# Altium PCB ZZ_KOM_ACB23_4009.PcbDoc (part 1 of 3)
Units mil, origin at the board's own origin, x right, y up, seen from the top; angles counter-clockwise.
Board outline 3937.01 x 2755.91 mil, 4 copper layers (Top Layer, Signal Layer 1, Signal Layer 2, Bottom Layer), stack 63.662 mil thick; 118 components, 212 nets, 909 pads, 347 vias.
Unrouted connection lines stored in the file: 40.
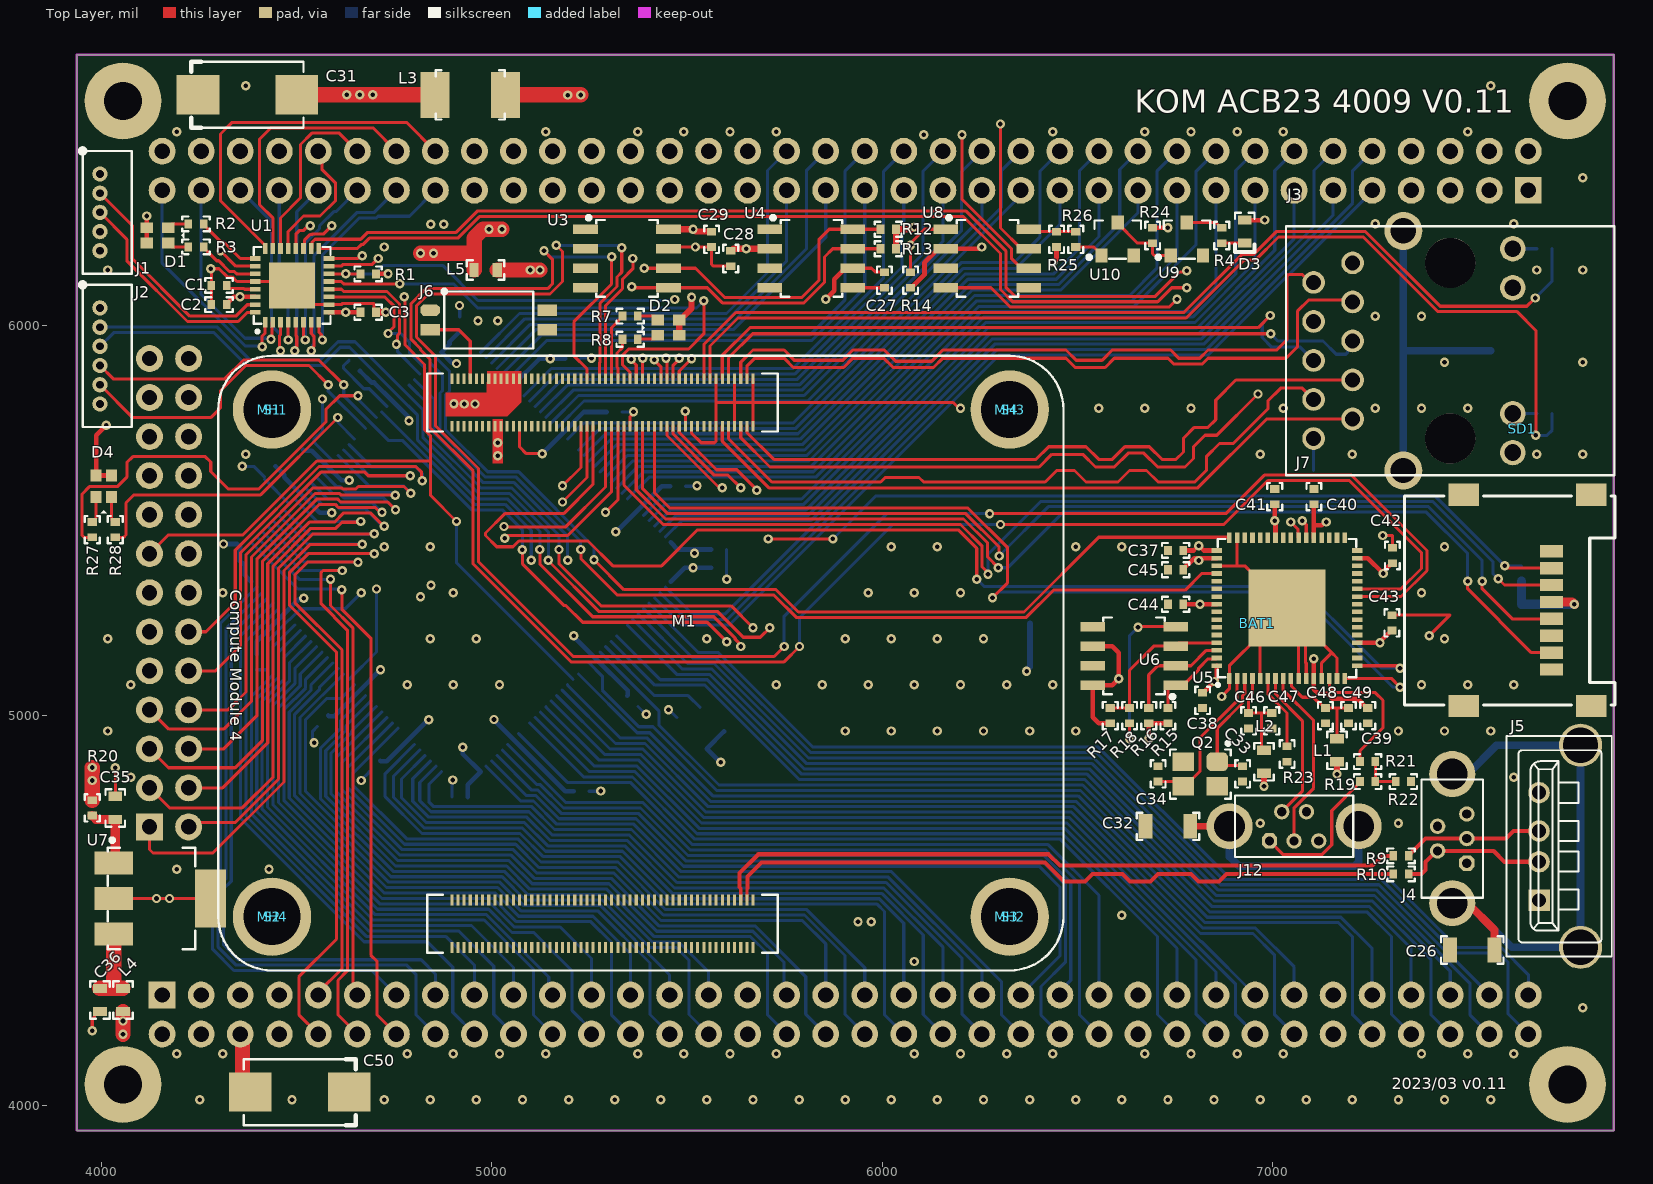
[diagram p0: Top Layer view]
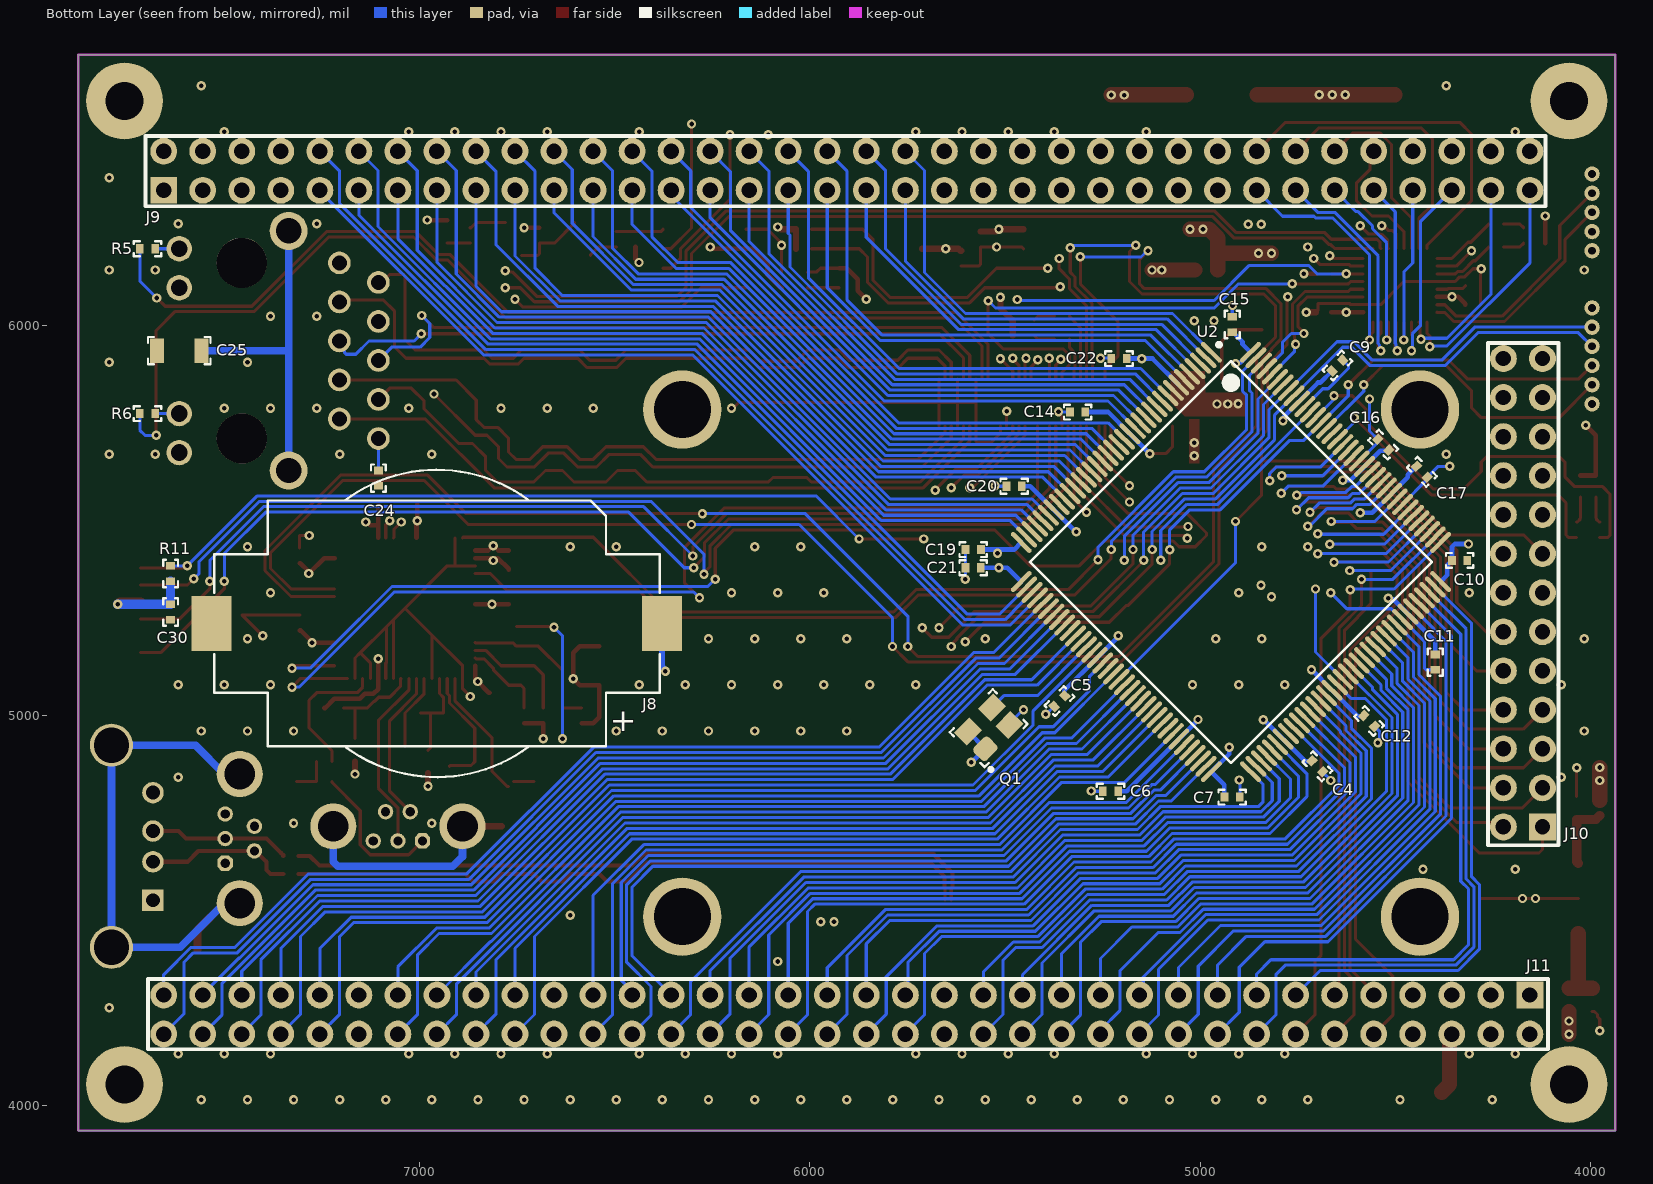
[diagram p1: Bottom Layer view, seen from below]
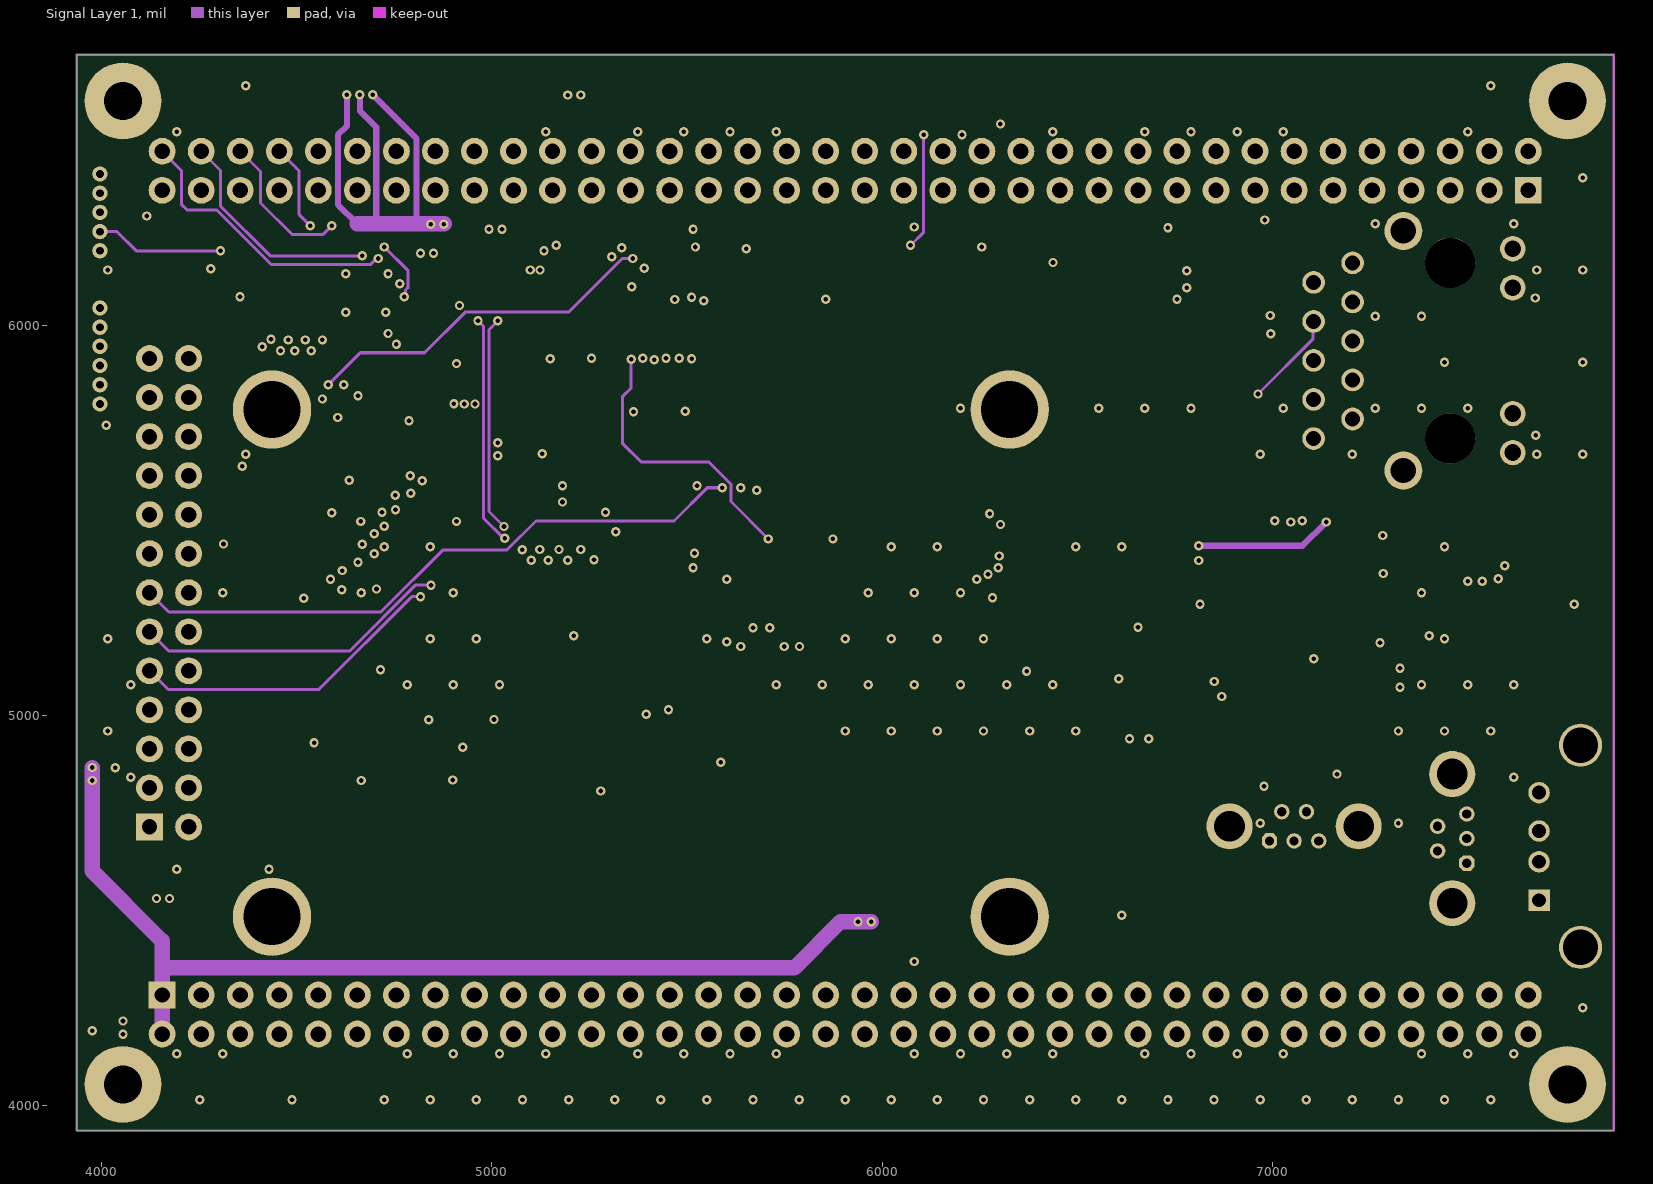
[diagram p2: Signal Layer 1]
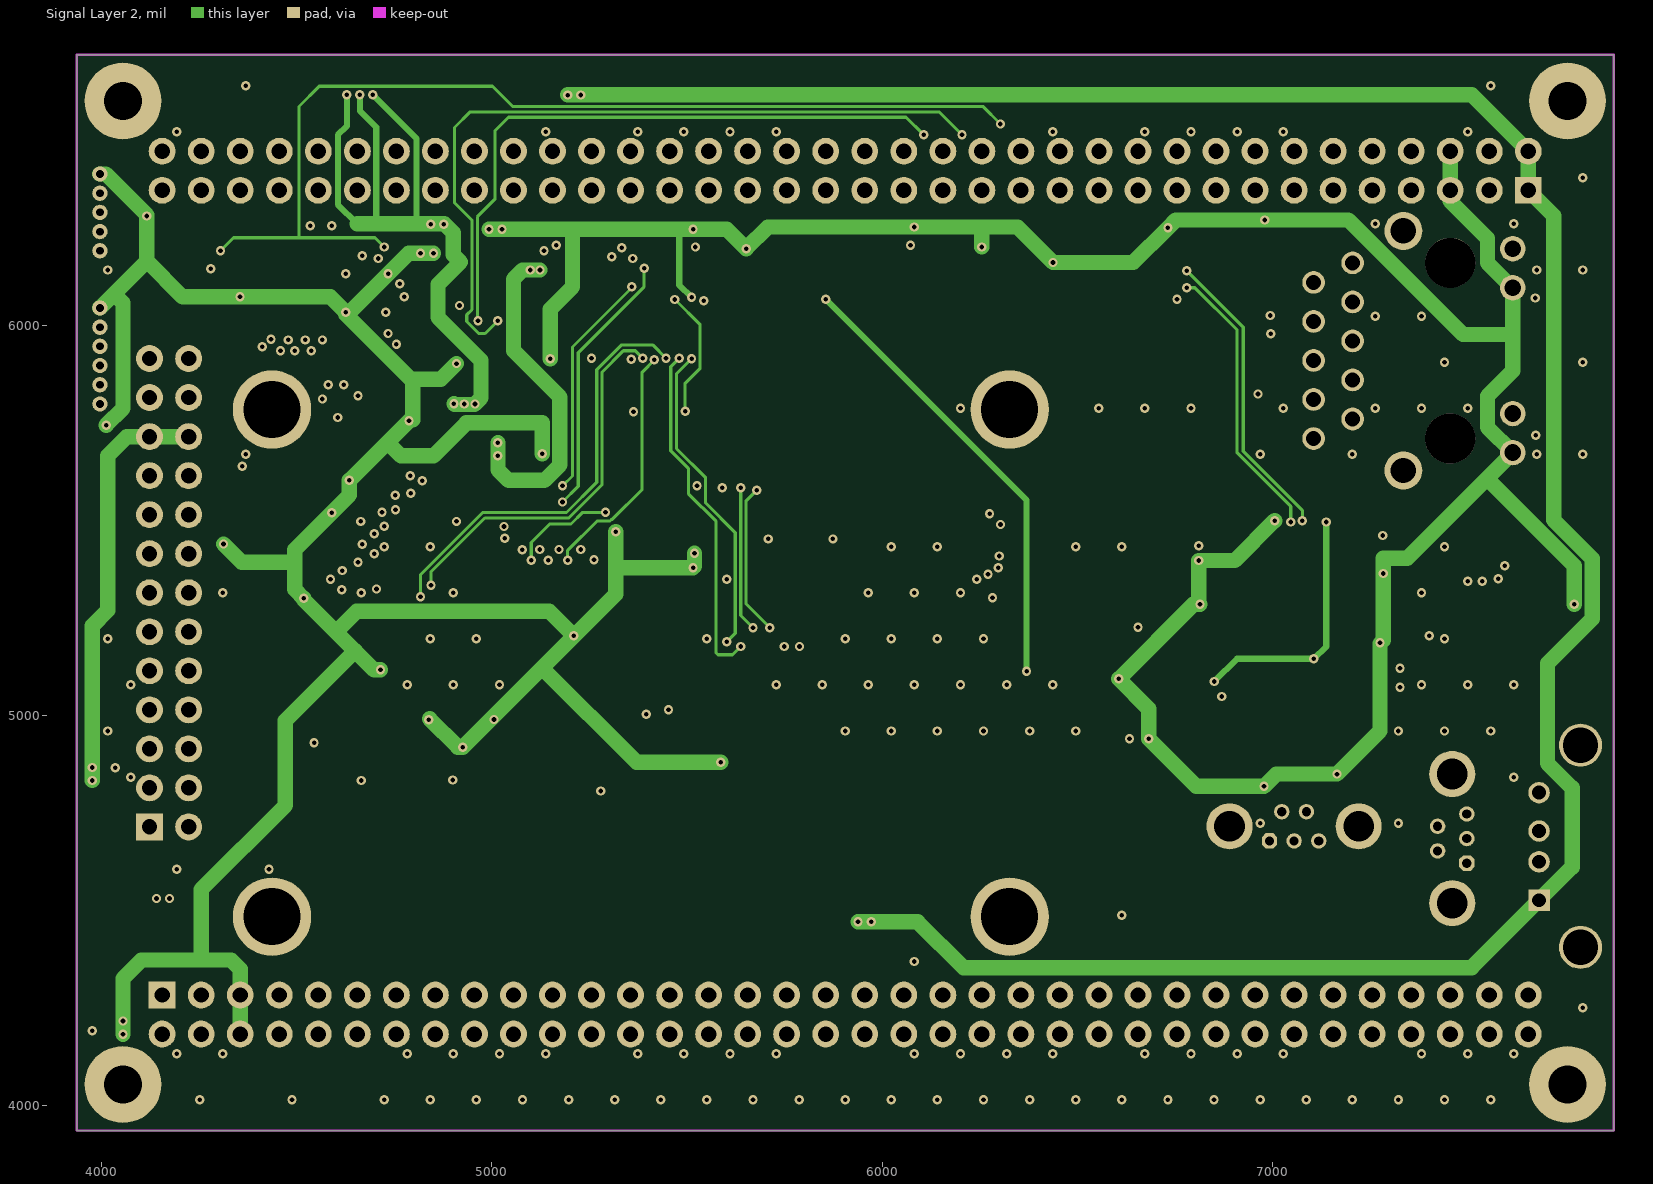
[diagram p3: Signal Layer 2]
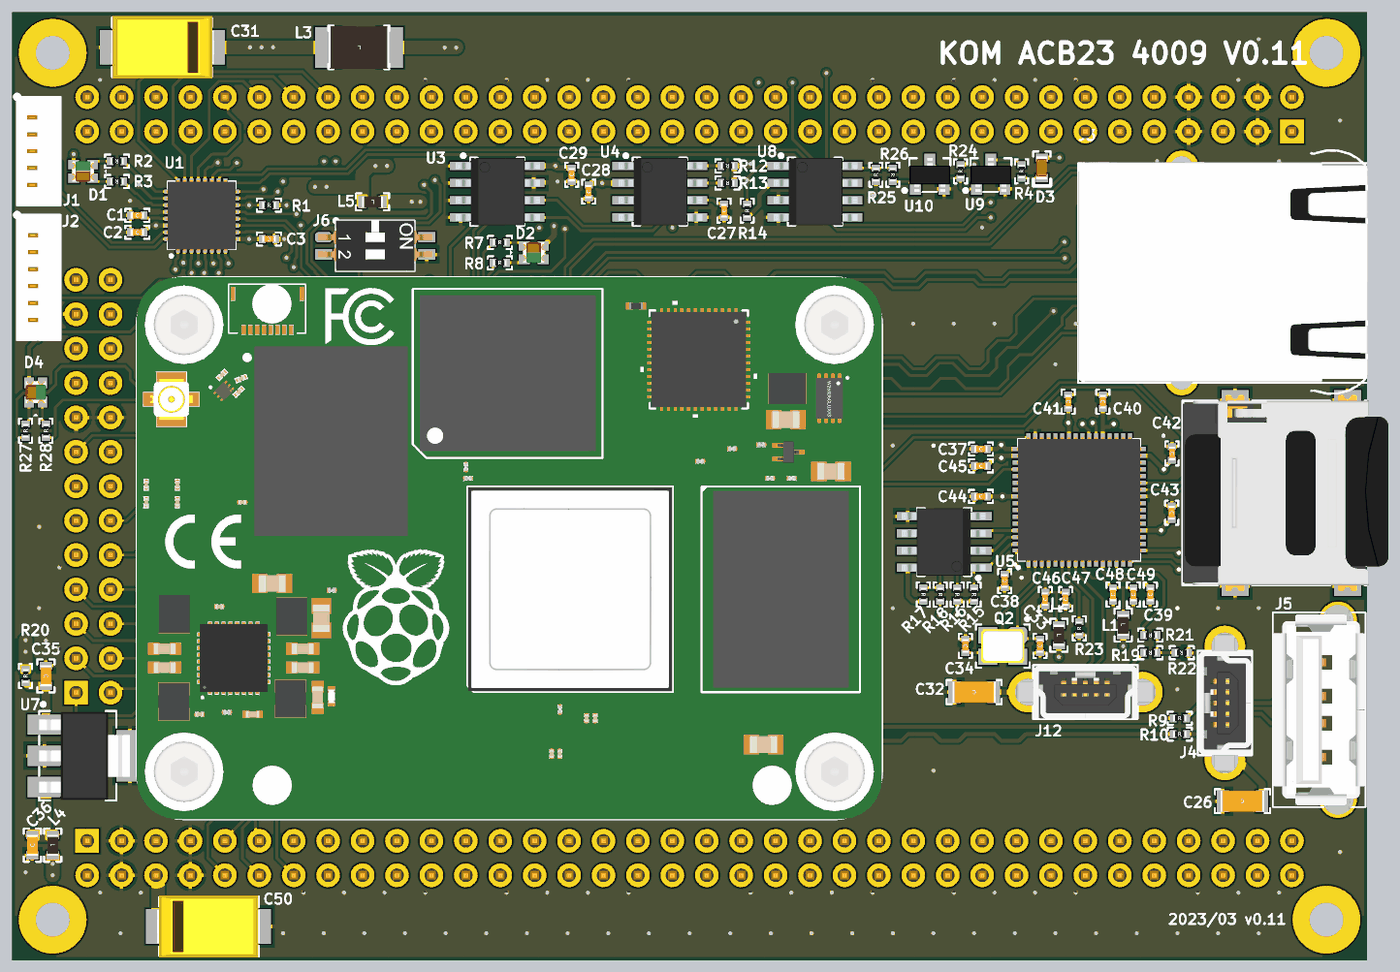
[diagram p6: 3D render of the assembled board from above, using the file's embedded part models]
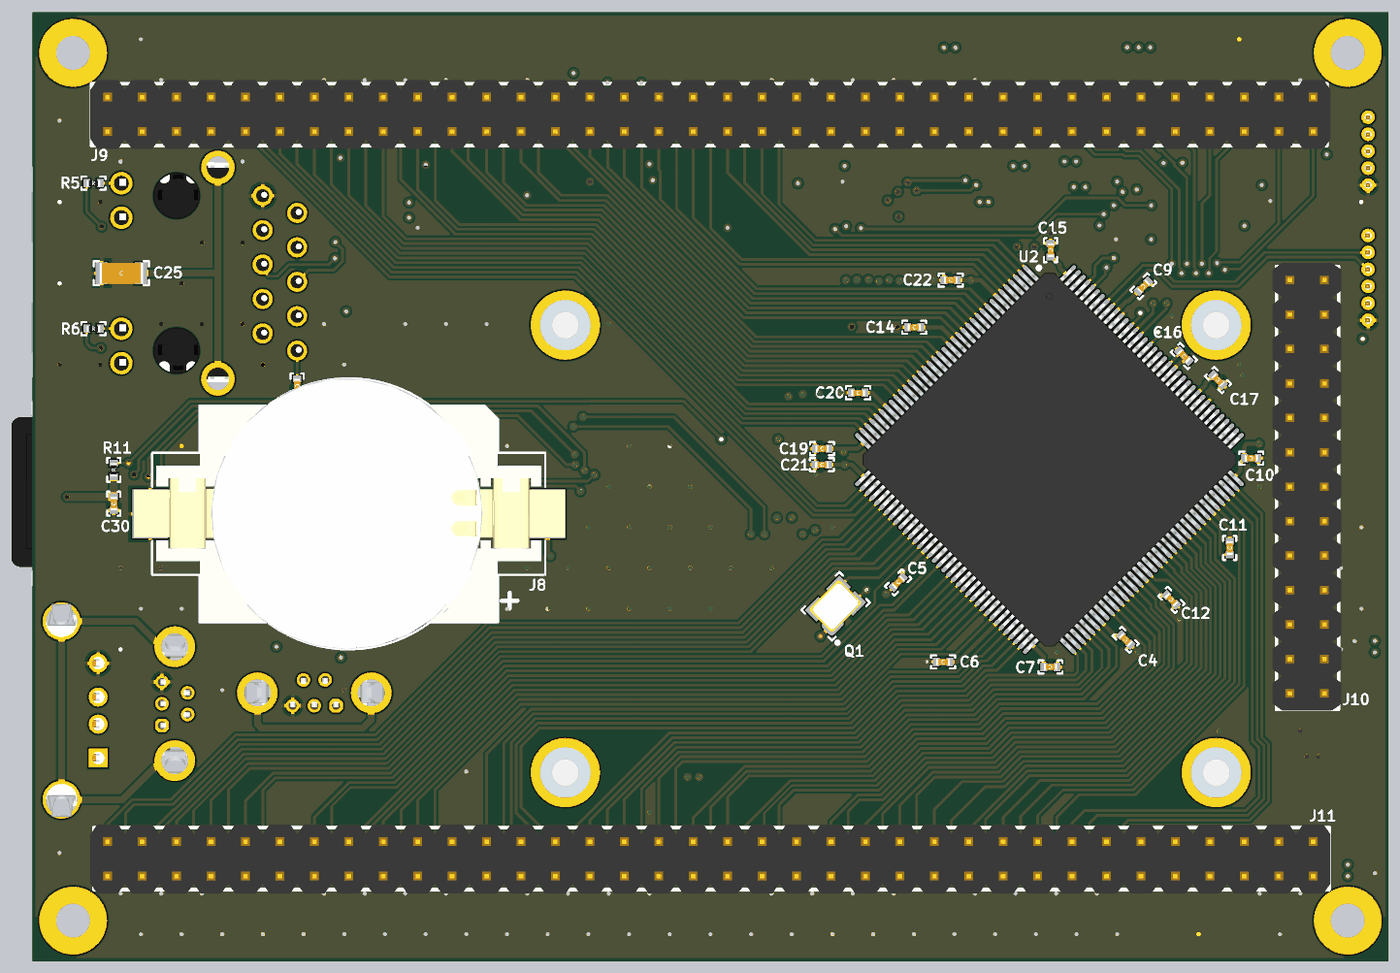
[diagram p7: 3D render of the assembled board from below, using the file's embedded part models]

## Layer stack, top to bottom
Top Solder: solder mask 0.6693, Solder Resist, Dk 3.5
Top Layer: signal copper 0.689
Dielectric 1: prepreg 6.1417, FR-4, Dk 3.9
Signal Layer 1: signal copper 1.378
Dielectric 2: core 47.2441, FR-4, Dk 4.4
Signal Layer 2: signal copper 1.378
Dielectric 3: prepreg 6.1417, FR-4, Dk 3.9
Bottom Layer: signal copper 0.689
Bottom Solder: solder mask 0.6693, Solder Resist, Dk 3.5

## Board outline
3937.01,3937.01 7874.02,3937.01 7874.02,6692.91 3937.01,6692.91

## Design rules (kind name [scope] priority, off if disabled: settings)
AcuteAngle [All] p1: minimum=5.00000000000000E+0001 checktracksonly=FALSE
Clearance PolygonClearance [InPolygon] p1: gap=6 ignorepadtopadclearanceinfootprint=FALSE except(0: Arc-Hole Track-Hole SMDPad-Hole THPad-Hole Via-Hole Fill-Hole Poly-Hole Region-Hole Text-Hole)
Clearance TopKeepoutClearance [OnLayer('Top Layer') vs OnLayer('Keep-Out Layer')] p2: gap=0 ignorepadtopadclearanceinfootprint=FALSE
Clearance BotKeepoutClearance [OnLayer('Bottom Layer') vs OnLayer('Keep-Out Layer')] p3: gap=0 ignorepadtopadclearanceinfootprint=FALSE
Clearance StdClearance [All] p4: gap=6 ignorepadtopadclearanceinfootprint=FALSE except(0: Arc-Hole Track-Hole SMDPad-Hole THPad-Hole Via-Hole Fill-Hole Poly-Hole Region-Hole Text-Hole)
ComponentClearance [All] p1 off: gap=10 collisioncheckmode=3 verticalgap=10 showdistances=FALSE
DiffPairsRouting Diff_Ethernet [InDifferentialPairClass('Ethernet')] p1: maxlimit=39.37 minlimit=5.91 mostfreqgap=23.62 toplayer_minwidth=7.87 toplayer_maxwidth=10.63 toplayer_prefwidth=10.63 midlayer1_minwidth=7.87 midlayer1_maxwidth=10.63 midlayer1_prefwidth=10.63 midlayer2_minwidth=7.87 midlayer2_maxwidth=10.63 midlayer2_prefwidth=10.63 bottomlayer_minwidth=7.87 bottomlayer_maxwidth=10.63 bottomlayer_prefwidth=10.63 maxuncoupledlength=500
DiffPairsRouting Diff_USB [InDifferentialPair('USB')] p2: maxlimit=5 minlimit=5 mostfreqgap=5 toplayer_minwidth=7.24 toplayer_maxwidth=7.24 toplayer_prefwidth=7.24 midlayer1_minwidth=2.93 midlayer1_maxwidth=2.93 midlayer1_prefwidth=2.93 midlayer2_minwidth=2.93 midlayer2_maxwidth=2.93 midlayer2_prefwidth=2.93 bottomlayer_minwidth=7.24 bottomlayer_maxwidth=7.24 bottomlayer_prefwidth=7.24 maxuncoupledlength=500
Height [All] p1: minheight=0 maxheight=2000 prefheight=500
HoleSize [All] p1: absolutevalues=TRUE maxlimit=196.85 minlimit=7.87 maxpercent=80.000 minpercent=20.000
MinimumAnnularRing [All] p1: minimumring=3.94
MinimumSolderMaskSliver [All] p1: minsoldermaskwidth=1
MinimumSolderMaskSliver SilkscreenOverComponentPads [All] p2 off: minsoldermaskwidth=10
PlaneConnect [All] p1: planeconnectstyle=Relief reliefexpansion=20 reliefentries=4 reliefconductorwidth=10 reliefairgap=20
PolygonConnect PolygonConnect_else [All vs IsPad] p1: connectstyle=Relief reliefconductorwidth=10 reliefentries=4 polygonreliefangle="90 Angle" airgapwidth=12
PolygonConnect PolygonConnect_direkt [All] p2: connectstyle=Direct reliefconductorwidth=10 reliefentries=4 polygonreliefangle="90 Angle" airgapwidth=10
RoutingVias [All] p1: holewidth=11.81 width=23.62 viastyle="Through Hole" minholewidth=11.81 minwidth=23.62 maxholewidth=118.11 maxwidth=157.48
SilkToBoardRegionClearance SilkToBoardRegionClearance_1 [All] p2:
SilkToSilkClearance [All] p1 off: silktosilkclearance=10
SilkToSolderMaskClearance [IsPad] p1: minsilkscreentomaskgap=0 clearancetoexposedcopper=TRUE
SolderMaskExpansion SolderMaskExpansion_1 [All] p1: expansion=4 istentingtop=FALSE
Width [All] p1: maxlimit=100 minlimit=4.92 preferedwidth=16 checkconnectedcopper=TRUE
22 further rules are at their usual default settings.

## Classes and differential pairs
component class 04_KOM_ACB23_4009_AdditionalComponents: BAT1 MH1 MH2 MH3 MH4 S1 S2 S3 S4 SD1
component class 09_KOM_ACB23_4009_Periphery: C31 C32 C33 C34 C35 C36 C37 C38 C39 C40 C41 C42 C43 C44 C45 C46 C47 C48 C49 C50 D3 J12 L1 L2 L3 L4 L5 Q2 R4 R15 R16 R17 R18 R19 R20 R21 R22 R23 R24 R25 R26 U5 U6 U7 U8 U9 U10
component class 08_KOM_ACB23_4009_Connectors: J9 J10 J11
component class 07_KOM_ACB23_4009_ComputeModule: C24 C25 C26 C27 C28 C29 C30 D2 J3 J4 J5 J6 J7 J8 M1 R5 R6 R7 R8 R9 R10 R11 R12 R13 R14 U3 U4
component class 06_KOM_ACB23_4009_FPGA: C4 C5 C6 C7 C9 C10 C11 C12 C14 C15 C16 C17 C19 C20 C21 C22 D4 J2 Q1 R27 R28 U2
component class 05_KOM_ACB23_4009_MicroController: C1 C2 C3 D1 J1 R1 R2 R3 U1
differential pair PAIR0: +PAIR0_P -PAIR0_N
differential pair PAIR1: +PAIR1_P -PAIR1_N
differential pair PAIR2: +PAIR2_P -PAIR2_N
differential pair PAIR3: +PAIR3_P -PAIR3_N
differential pair USB: +USB_P -USB_N

## Components (designator, comment, footprint, x,y, rotation, side; value= is the part's Value field where it differs from the comment)
BAT1 "CR2032" CR2032 6960.84,5236.22 r0 top
C1 "C0402C104K3RACTU" C0402 4301.18,6102.36 r0 top value=100nF
C2 "C0402C104K3RACTU" C0402 4301.18,6053.15 r0 top value=100nF
C3 "C0402C104K3RACTU" C0402 4683.46,6033.46 r180 top value=100nF
C4 "C0402C104K3RACTU" C0402 4699.89,4870.33 r45 bottom value=100nF
C5 "C0402C104K3RACTU" C0402 5360.5,5037.36 r135 bottom value=100nF
C6 "C0402C104K3RACTU" C0402 5229.98,4806.25 r180 bottom value=100nF
C7 "C0402C104K3RACTU" C0402 4918.25,4791.59 r0 bottom value=100nF
C9 "C0402C104K3RACTU" C0402 4648.44,5896.97 r315 bottom value=100nF
C10 "C0402C104K3RACTU" C0402 4335.15,5397.72 r0 bottom value=100nF
C11 "C0402C104K3RACTU" C0402 4397.89,5137.23 r90 bottom value=100nF
C12 "C0402C104K3RACTU" C0402 4567.23,4986.46 r45 bottom value=100nF
C14 "C0402C104K3RACTU" C0402 5313.99,5777.88 r180 bottom value=100nF
C15 "C0402C104K3RACTU" C0402 4918,6002 r270 bottom value=100nF
C16 "C0402C104K3RACTU" C0402 4531.08,5694.41 r225 bottom value=100nF
C17 "C0402C104K3RACTU" C0402 4432.05,5624.85 r45 bottom value=100nF
C19 "C0402C104K3RACTU" C0402 5581.51,5425.57 r180 bottom value=100nF
C20 "C0402C104K3RACTU" C0402 5476.79,5587.78 r180 bottom value=100nF
C21 "C0402C104K3RACTU" C0402 5581.82,5378.99 r180 bottom value=100nF
C22 "C0402C104K3RACTU" C0402 5207.91,5914.96 r180 bottom value=100nF
C24 "C0402C104K3RACTU" C0402 7105.51,5608.46 r270 bottom value=100nF
C25 "CC1206KKX7RSBB102" C1206 7615.75,5935.04 r180 bottom value=1.0nF
C26 "CC1206KKX7RSBB102" C1206 7511.81,4399.61 r180 top value=1.0nF
C27 "C0402C104K3RACTU" C0402 6005.91,6115.94 r90 top value=100nF
C28 "C0402C104K3RACTU" C0402 5612.2,6171.26 r90 top value=100nF
C29 "C0402C104K3RACTU" C0402 5562.99,6220.47 r90 top value=100nF
C30 "C0402C104K3RACTU" C0402 7637.8,5265.75 r90 bottom value=100nF
C31 "T491D227K010AT" TANTAL_7343 4374.02,6590.55 r180 top value=220uF
C32 "CC1206KKX7RSBB102" C1206 6732.28,4716.54 r180 top value=1.0nF
C33 "C0402C220J4GACAUTO" C0402 6923.62,4850.79 r90 top value=22pF
C34 "C0402C220J4GACAUTO" C0402 6707.09,4850.79 r270 top value=22pF
C35 "JMK107BJ106MA-T" C0603 4035.43,4763.78 r270 top value=10uF
C36 "JMK107BJ106MA-T" C0603 3996.06,4271.65 r90 top value=10uF
C37 "GRM153R60J475ME15D" C0402 6751.97,5423.23 r0 top value=4.7uF
C38 "C0402C104K3RACTU" C0402 6820.87,5039.37 r90 top value=100nF
C39 "C0402C104K3RACTU" C0402 7244.09,5000 r90 top value=100nF
C40 "C0402C104K3RACTU" C0402 7106.3,5561.02 r270 top value=100nF
C41 "C0402C104K3RACTU" C0402 7005.91,5561.02 r270 top value=100nF
C42 "C0402C104K3RACTU" C0402 7307.27,5410.46 r270 top value=100nF
C43 "C0402C104K3RACTU" C0402 7306.29,5237.9 r270 top value=100nF
C44 "C0402C104K3RACTU" C0402 6751.97,5285.43 r0 top value=100nF
C45 "C0402C104K3RACTU" C0402 6751.97,5374.02 r0 top value=100nF
C46 "GRM153R60J475ME15D" C0402 6938.98,4986.93 r90 top value=4.7uF
C47 "C0402C104K3RACTU" C0402 6998.03,4986.93 r90 top value=100nF
C48 "GRM153R60J475ME15D" C0402 7135.83,5000 r90 top value=4.7uF
C49 "C0402C104K3RACTU" C0402 7194.88,5000 r90 top value=100nF
C50 "T491D227K010AT" TANTAL_7343 4507.87,4035.43 r0 top value=220uF
D1 "LTST-C195KGJRKT" "SMD LED 0606 DUAL GREEN RED" 4143.7,6230.31 r180 top
D2 "LTST-C195KGJRKT" "SMD LED 0606 DUAL GREEN RED" 5452.76,5994.09 r0 top
D3 "APT1608EC" "LED 0603 RED" 6929.13,6240.16 r270 top
D4 "LTST-C195KGJRKT" "SMD LED 0606 DUAL GREEN RED" 4005.91,5587.78 r90 top
J1 "53047-0510" "PicoBlade 01x05 THT Male" 3996.06,6289.37 r90 top
J2 "53047-0610" "PicoBlade 01x06 THT Male" 3996.06,5921.58 r90 top
J3 "93626-3006" 93626-3508 7455.51,5935.04 r90 top
J4 "651005136421" "USB MiniUSB B Vertical THT" 7460.63,4685.04 r90 top
J5 "614004135023" 614004135023 7736.22,4665.35 r90 top
J6 "416131160802" 416131160802 4992.13,6013.78 r0 top
J7 "693072010801" 693072010801 7608.27,5295.28 r90 top
J8 "1060TR" 1060TR 6955.51,5236.22 r180 bottom
J9 "77313-424-72LF" "Pinheader 02x36" 7655.51,6346.06 r180 bottom locked
J10 "75844-127-26LF" "Pinheader 02x13" 4123.22,4714.96 r90 bottom locked
J11 "77313-424-72LF" "Pinheader 02x36" 4155.51,4284.25 r0 bottom locked
J12 "651005136421" "USB MiniUSB B Vertical THT" 7055.51,4716.54 r0 top
L1 "742792651" L0603 7165.35,4911.42 r270 top
L2 "742792651" L0603 6978.35,4881.89 r270 top
L3 "742792514" L1812 4944.88,6590.55 r180 top
L4 "742792651" L0603 4055.12,4271.65 r270 top
L5 "742792651" L0603 4984.25,6141.73 r180 top
M1 "RaspberryPi Compute Module 4" RASPBERRYCOMPUTEMODULE4 5381.89,5134.65 r270 top locked
MH1 "9774015151R" 9774015151R 4437.01,5784.25 r0 top
MH2 "9774015151R" 9774015151R 6326.77,4485.04 r0 top
MH3 "9774015151R" 9774015151R 6326.77,5784.25 r0 top
MH4 "9774015151R" 9774015151R 4437.01,4485.04 r0 top
Q1 "ECS-3225MV-480-CN-TR" Crystal_3.2x2.5 5542,4967.9 r135 bottom value="48.0 Mhz"
Q2 "ABM8W-12.0000MHZ-7-D1X-T3" Crystal_3.2x2.5 6815.35,4850.39 r180 top value="12.0 Mhz"
R1 "RC0402FR-0710KL" R0402 4683.46,6131.89 r0 top value=10.0k
R2 "RC0402FR-07220RL" R0402 4242.13,6259.84 r180 top value=220R
R3 "RC0402FR-07220RL" R0402 4242.13,6200.79 r180 top value=220R
R4 "RC0402FR-07220RL" R0402 6870.08,6230.31 r90 top value=220R
R5 "RC0402FR-07430RL" R0402 7696.85,6196.26 r180 bottom value=430R
R6 "RC0402FR-07430RL" R0402 7696.85,5773.82 r180 bottom value=430R
R7 "RC0402FR-07220RL" R0402 5354.33,6023.62 r0 top value=220R
R8 "RC0402FR-07220RL" R0402 5354.33,5964.57 r0 top value=220R
R9 "RC0402FR-0722RL" R0402 7329.53,4640.84 r0 top value=22.0R
R10 "RC0402FR-0722RL" R0402 7329.53,4594.49 r0 top value=22.0R
R11 "RC0402FR-0710KL" R0402 7637.8,5364.17 r90 bottom value=10.0k
R12 "RC0402FR-0710KL" R0402 6015.75,6246.26 r180 top value=10.0k
R13 "RC0402FR-0710KL" R0402 6015.75,6196.26 r180 top value=10.0k
R14 "RC0402FR-0710KL" R0402 6072.83,6115.94 r90 top value=10.0k
R15 "RC0402FR-0710KL" R0402 6732.28,5000 r270 top value=10.0k
R16 "RC0402FR-0710KL" R0402 6683.07,5000 r270 top value=10.0k
R17 "RC0402FR-0710KL" R0402 6584.65,5000 r270 top value=10.0k
R18 "RC0402FR-072K2L" R0402 6633.86,5000 r270 top value=2.2k
R19 "RC0402FR-074K7L" R0402 7244.09,4831.1 r180 top value=4.7k
R20 "RC0402FR-070RL" R0402 3976.38,4763.78 r90 top value=0R
R21 "RC0402FR-071KL" R0402 7244.09,4882.28 r180 top value=1.0k
R22 "RC0402FR-0710KL" R0402 7335.43,4831.1 r180 top value=10.0k
R23 "RC0402FR-0712KL" R0402 7037.4,4901.97 r90 top value=12.0k
R24 "RC0402FR-072K2L" R0402 6692.91,6230.31 r90 top value=2.2k
R25 "RC0402FR-0710KL" R0402 6446.85,6220.47 r90 top value=10.0k
R26 "RC0402FR-0710KL" R0402 6496.06,6220.47 r270 top value=10.0k
R27 "RC0402FR-07220RL" R0402 3976.38,5476.43 r90 top value=220R
R28 "RC0402FR-07220RL" R0402 4035.43,5476.43 r90 top value=220R
S1 "DIN912 M2.5x4" "DIN912 M2.5x4" 4437.01,5784.25 r0 top
S2 "DIN912 M2.5x4" "DIN912 M2.5x4" 4437.01,4485.04 r0 top
S3 "DIN912 M2.5x4" "DIN912 M2.5x4" 6326.77,4485.04 r0 top
S4 "DIN912 M2.5x4" "DIN912 M2.5x4" 6326.77,5784.25 r0 top
SD1 "MicroSD Card" MICROSDCARD 7640.32,5734.57 r90 top
U1 "ATSAMC21E17A-MUT" QFN32_5x5_0.50 4488.19,6102.36 r90 top
U2 "LCMXO2-7000HC-4TG144C" TQFP-144_20x20_P0.5 4921.26,5393.7 r225 bottom locked
U3 "24LC512-I/SN" soic-8 5346.46,6171.26 r270 top
U4 "DS3231MZ+" SOIC-8 5818.9,6171.26 r270 top
U5 "FT4232HQ" QFN64_9x9_0.50 7037.4,5275.59 r90 top
U6 "93LC46B-I/SN" SOIC-8 6645.67,5152.95 r90 top
U7 "LT1963EST-3.3#PBF" SOT-223-2 4031.5,4622.05 r0 top
U8 "MAX706TESA+T" SOIC-8 6269.69,6171.26 r270 top
U9 "BC847C,235" SOT-23-3 6781.5,6220.47 r90 top
U10 "BC847C,235" SOT-23-3 6604.33,6220.47 r90 top

## Footprints (in the part's own frame and the unit in brackets; to place one, negate y for a bottom-side part, rotate by r counter-clockwise, add the part's x,y. Pads: shape width x height; smd on the part's side, far side on the other; paste and mask are expansions set on the pad)
1060TR [mm] "Batteriehalter CR2032"
  rect 2.6x3.6 smd: +(14.655,0) -(-14.655,0)
  silkscreen extent -14.5,-10 14.5,10, body extent -15.86,-7.96 15.97,8.04, height 5.69
93626-3508 [mm] "Molex MagJack 1Gbit without POE"
  round 1.478 hole 0.97: 1(-5.715,8.89) 2(-4.445,6.35) 3(-3.175,8.89) 4(-1.905,6.35) 5(-0.635,8.89) 6(0.635,6.35) 7(1.905,8.89) 8(3.175,6.35) 9(4.445,8.89) 10(5.715,6.35)
  round 1.65 hole 1.1: 11(-6.635,-4.07) 12(-4.095,-4.07) 13(4.095,-4.07) 14(6.635,-4.07)
  round 2.475 hole 1.65: S(-7.795,3.05) S(7.795,3.05)
  round 3.26 hole 3.26 unplated: ""(-5.715,0) ""(5.715,0)
  silkscreen extent -8.1,-10.69 8.1,10.69, body extent -9.01,-10.69 9.14,10.69, height 15.2
9774015151R [mm] "WA-SMSE SMD Steel M2.5 Internal L2.9mm (1.5mm)"
  round 5.1 hole 3.7: 2775(0,0)
  body extent -2.55,-2.55 2.55,2.55, height 1.5
416131160802 [mm]
  oct 1.27x0.76 smd: L1(-3.81,0.635)
  rect 1.27x0.76 smd: L2(-3.81,-0.635) R1(3.81,0.635) R2(3.81,-0.635)
  silkscreen extent -3.03,-1.86 2.9,1.98, body extent -4.22,-1.86 4.22,1.86, height 2.6
614004135023 [mm] "4 pins"
  rect 1.4x1.4 hole 0.9: 1(-3.51,1.35)
  round 1.4 hole 0.9: 2(-1.01,1.35) 3(0.99,1.35) 4(3.49,1.35)
  round 2.8 hole 2.3: S(-6.58,-1.35) S(6.58,-1.35)
  silkscreen extent -7.18,-3.38 7.17,3.46, body extent -7.85,-3.38 7.85,3.46, height 3.47
693072010801 [mm] "Micro SD Card Connector Hinge - 8 Pins"
  rect 0.8x1.5 smd: 1(3.2,-2.7) 2(2.1,-2.7) 3(1,-2.7) 4(-0.1,-2.7) 5(-1.2,-2.7) 6(-2.3,-2.7) 7(-3.4,-2.7) 8(-4.5,-2.7)
  rect 1.45x2 smd: Shield(-6.875,-5.3) Shield(-6.875,3) Shield(6.875,-5.3) Shield(6.875,3)
  silkscreen extent -6.8,-6.85 6.8,6.85, body extent -7.25,-6.85 7.25,6.85, height 1.79
C0402 [mm]
  rect 0.5x0.6 smd: 1(-0.5,0) 2(0.5,0)
  silkscreen extent -0.89,-0.48 0.89,0.48, body extent -0.5,-0.25 0.5,0.25, height 0.35
C0603 [mm]
  rect 0.6x0.9 smd: 1(-0.75,0) 2(0.75,0)
  silkscreen extent -1.22,-0.64 1.22,0.64, body extent -0.77,-0.42 0.78,0.43, height 0.35
C1206 [mm]
  rect 0.9x1.6 smd: 1(-1.45,0) 2(1.45,0)
  silkscreen extent -2.03,-0.89 2.03,0.89, body extent -1.6,-0.8 1.6,0.8, height 0.55
CR2032 [mil]
  body extent -394,-394 394,394
Crystal_3.2x2.5 [mm]
  rrect50% 1.4x1.2 smd: 1(-1.1,-0.8)
  rect 1.4x1.2 smd: 2(1.1,-0.8) 3(1.1,0.8) 4(-1.1,0.8)
  silkscreen extent -1.98,-2.1 1.98,1.6, body extent -1.6,-1.25 1.6,1.25, height 0.7
"DIN912 M2.5x4" [mil]
  body extent -89,-89 89,88, height 201
L0603 [mm]
  rect 0.6x0.9 smd: 1(-0.75,0) 2(0.75,0)
  silkscreen extent -1.22,-0.64 1.22,0.64, body extent -0.77,-0.42 0.78,0.43, height 0.35
L1812 [mm]
  rect 1.9x3 smd: 1(-2.3,0) 2(2.3,0)
  silkscreen extent -2.25,-1.6 2.25,1.6, body extent -2.25,-1.6 2.25,1.6, height 1.5
"LED 0603 RED" [mm]
  rect 0.6x0.9 smd: 1(-0.75,0) 2(0.75,0)
  silkscreen extent -1.22,-0.64 1.32,0.64, body extent -0.85,-0.4 0.85,0.4, height 0.65
MICROSDCARD [mil]
  body extent -653,-296 -217,296, height 63
"PicoBlade 01x05 THT Male" [mm]
  round 1 hole 0.5: 1(2.5,0) 2(1.25,0) 3(0,0) 4(-1.25,0) 5(-2.5,0)
  silkscreen extent -4,-2.07 4.18,1.3, body extent -4.01,-2.06 3.99,1.14, height 4.24
"PicoBlade 01x06 THT Male" [mm]
  round 1 hole 0.5: 1(3.125,0) 2(1.875,0) 3(0.625,0) 4(-0.625,0) 5(-1.875,0) 6(-3.125,0)
  silkscreen extent -4.62,-2.07 4.8,1.3, body extent -4.62,-2.1 4.63,1.1, height 4.23
"Pinheader 02x13" [mm]
  rect 1.75x1.75 hole 1: 1(0,0)
  round 1.75 hole 1: 2(0,2.54) 3(2.54,0) 4(2.54,2.54) 5(5.08,0) 6(5.08,2.54) 7(7.62,0) 8(7.62,2.54) 9(10.16,0) 10(10.16,2.54) 11(12.7,0) 12(12.7,2.54) 13(15.24,0) 14(15.24,2.54) 15(17.78,0) 16(17.78,2.54) 17(20.32,0) 18(20.32,2.54) 19(22.86,0) 20(22.86,2.54) 21(25.4,0) 22(25.4,2.54) 23(27.94,0) 24(27.94,2.54) 25(30.48,0) 26(30.48,2.54)
  silkscreen extent -1.19,-1.04 31.5,3.53, body extent -1.27,-1.27 31.75,3.81, height 10.1
"Pinheader 02x36" [mm]
  rect 1.75x1.75 hole 1: 1(0,0)
  round 1.75 hole 1: 2(0,2.54) 3(2.54,0) 4(2.54,2.54) 5(5.08,0) 6(5.08,2.54) 7(7.62,0) 8(7.62,2.54) 9(10.16,0) 10(10.16,2.54) 11(12.7,0) 12(12.7,2.54) 13(15.24,0) 14(15.24,2.54) 15(17.78,0) 16(17.78,2.54) 17(20.32,0) 18(20.32,2.54) 19(22.86,0) 20(22.86,2.54) 21(25.4,0) 22(25.4,2.54) 23(27.94,0) 24(27.94,2.54) 25(30.48,0) 26(30.48,2.54) 27(33.02,0) 28(33.02,2.54) 29(35.56,0) 30(35.56,2.54) 31(38.1,0) 32(38.1,2.54) 33(40.64,0) 34(40.64,2.54) 35(43.18,0) 36(43.18,2.54) 37(45.72,0) 38(45.72,2.54) 39(48.26,0) 40(48.26,2.54) 41(50.8,0) 42(50.8,2.54) 43(53.34,0) 44(53.34,2.54) 45(55.88,0) 46(55.88,2.54) 47(58.42,0) 48(58.42,2.54) 49(60.96,0) 50(60.96,2.54) 51(63.5,0) 52(63.5,2.54) 53(66.04,0) 54(66.04,2.54) 55(68.58,0) 56(68.58,2.54) 57(71.12,0) 58(71.12,2.54) 59(73.66,0) 60(73.66,2.54) 61(76.2,0) 62(76.2,2.54) 63(78.74,0) 64(78.74,2.54) 65(81.28,0) 66(81.28,2.54) 67(83.82,0) 68(83.82,2.54) 69(86.36,0) 70(86.36,2.54) 71(88.9,0) 72(88.9,2.54)
  silkscreen extent -1.19,-1.04 89.92,3.53, body extent -1.27,-1.27 90.17,3.81, height 10.1
QFN32_5x5_0.50 [mm]
  rect 0.7x0.3 smd: 1(-2.4,1.75) 2(-2.4,1.25) 3(-2.4,0.75) 4(-2.4,0.25) 5(-2.4,-0.25) 6(-2.4,-0.75) 7(-2.4,-1.25) 8(-2.4,-1.75) 17(2.4,-1.75) 18(2.4,-1.25) 19(2.4,-0.75) 20(2.4,-0.25) 21(2.4,0.25) 22(2.4,0.75) 23(2.4,1.25) 24(2.4,1.75)
  rect 0.3x0.7 smd: 9(-1.75,-2.4) 10(-1.25,-2.4) 11(-0.75,-2.4) 12(-0.25,-2.4) 13(0.25,-2.4) 14(0.75,-2.4) 15(1.25,-2.4) 16(1.75,-2.4) 25(1.75,2.4) 26(1.25,2.4) 27(0.75,2.4) 28(0.25,2.4) 29(-0.25,2.4) 30(-0.75,2.4) 31(-1.25,2.4) 32(-1.75,2.4)
  rect 3x3 smd: EP(0,0)
  silkscreen extent -3.08,-2.5 2.5,2.5, body extent -2.61,-2.59 2.59,2.61, height 0.76
QFN64_9x9_0.50 [mm]
  rect 0.7x0.3 smd: 1(-4.575,3.75) 2(-4.575,3.25) 3(-4.575,2.75) 4(-4.575,2.25) 5(-4.575,1.75) 6(-4.575,1.25) 7(-4.575,0.75) 8(-4.575,0.25) 9(-4.575,-0.25) 10(-4.575,-0.75) 11(-4.575,-1.25) 12(-4.575,-1.75) 13(-4.575,-2.25) 14(-4.575,-2.75) 15(-4.575,-3.25) 16(-4.575,-3.75) 33(4.575,-3.75) 34(4.575,-3.25) 35(4.575,-2.75) 36(4.575,-2.25) 37(4.575,-1.75) 38(4.575,-1.25) 39(4.575,-0.75) 40(4.575,-0.25) 41(4.575,0.25) 42(4.575,0.75) 43(4.575,1.25) 44(4.575,1.75) 45(4.575,2.25) 46(4.575,2.75) 47(4.575,3.25) 48(4.575,3.75)
  rect 0.3x0.7 smd: 17(-3.75,-4.575) 18(-3.25,-4.575) 19(-2.75,-4.575) 20(-2.25,-4.575) 21(-1.75,-4.575) 22(-1.25,-4.575) 23(-0.75,-4.575) 24(-0.25,-4.575) 25(0.25,-4.575) 26(0.75,-4.575) 27(1.25,-4.575) 28(1.75,-4.575) 29(2.25,-4.575) 30(2.75,-4.575) 31(3.25,-4.575) 32(3.75,-4.575) 49(3.75,4.575) 50(3.25,4.575) 51(2.75,4.575) 52(2.25,4.575) 53(1.75,4.575) 54(1.25,4.575) 55(0.75,4.575) 56(0.25,4.575) 57(-0.25,4.575) 58(-0.75,4.575) 59(-1.25,4.575) 60(-1.75,4.575) 61(-2.25,4.575) 62(-2.75,4.575) 63(-3.25,4.575) 64(-3.75,4.575)
  rect 5x5 smd: EP(0,0)
  silkscreen extent -5.08,-4.5 4.5,4.58, body extent -4.6,-4.6 4.6,4.6, height 0.76
R0402 [mm]
  rect 0.5x0.6 smd: 1(-0.5,0) 2(0.5,0)
  silkscreen extent -0.89,-0.48 0.89,0.48, body extent -0.5,-0.25 0.5,0.25, height 0.35
RASPBERRYCOMPUTEMODULE4 [mm]
  rect 0.7x0.2 smd: 1(-18.5,7.3) 2(-15.42,7.3) 3(-18.5,6.9) 4(-15.42,6.9) 5(-18.5,6.5) 6(-15.42,6.5) 7(-18.5,6.1) 8(-15.42,6.1) 9(-18.5,5.7) 10(-15.42,5.7) 11(-18.5,5.3) 12(-15.42,5.3) 13(-18.5,4.9) 14(-15.42,4.9) 15(-18.5,4.5) 16(-15.42,4.5) 17(-18.5,4.1) 18(-15.42,4.1) 19(-18.5,3.7) 20(-15.42,3.7) 21(-18.5,3.3) 22(-15.42,3.3) 23(-18.5,2.9) 24(-15.42,2.9) 25(-18.5,2.5) 26(-15.42,2.5) 27(-18.5,2.1) 28(-15.42,2.1) 29(-18.5,1.7) 30(-15.42,1.7) 31(-18.5,1.3) 32(-15.42,1.3) 33(-18.5,0.9) 34(-15.42,0.9) 35(-18.5,0.5) 36(-15.42,0.5) 37(-18.5,0.1) 38(-15.42,0.1) 39(-18.5,-0.3) 40(-15.42,-0.3) 41(-18.5,-0.7) 42(-15.42,-0.7) 43(-18.5,-1.1) 44(-15.42,-1.1) 45(-18.5,-1.5) 46(-15.42,-1.5) 47(-18.5,-1.9) 48(-15.42,-1.9) 49(-18.5,-2.3) 50(-15.42,-2.3) 51(-18.5,-2.7) 52(-15.42,-2.7) 53(-18.5,-3.1) 54(-15.42,-3.1) 55(-18.5,-3.5) 56(-15.42,-3.5) 57(-18.5,-3.9) 58(-15.42,-3.9) 59(-18.5,-4.3) 60(-15.42,-4.3) 61(-18.5,-4.7) 62(-15.42,-4.7) 63(-18.5,-5.1) 64(-15.42,-5.1) 65(-18.5,-5.5) 66(-15.42,-5.5) 67(-18.5,-5.9) 68(-15.42,-5.9) 69(-18.5,-6.3) 70(-15.42,-6.3) 71(-18.5,-6.7) 72(-15.42,-6.7) 73(-18.5,-7.1) 74(-15.42,-7.1) 75(-18.5,-7.5) 76(-15.42,-7.5) 77(-18.5,-7.9) 78(-15.42,-7.9) 79(-18.5,-8.3) 80(-15.42,-8.3) 81(-18.5,-8.7) 82(-15.42,-8.7) 83(-18.5,-9.1) 84(-15.42,-9.1) 85(-18.5,-9.5) 86(-15.42,-9.5) 87(-18.5,-9.9) 88(-15.42,-9.9) 89(-18.5,-10.3) 90(-15.42,-10.3) 91(-18.5,-10.7) 92(-15.42,-10.7) 93(-18.5,-11.1) 94(-15.42,-11.1) 95(-18.5,-11.5) 96(-15.42,-11.5) 97(-18.5,-11.9) 98(-15.42,-11.9) 99(-18.5,-12.3) 100(-15.42,-12.3) 101(15.42,7.3) 102(18.5,7.3) 103(15.42,6.9) 104(18.5,6.9) 105(15.42,6.5) 106(18.5,6.5) 107(15.42,6.1) 108(18.5,6.1) 109(15.42,5.7) 110(18.5,5.7) 111(15.42,5.3) 112(18.5,5.3) 113(15.42,4.9) 114(18.5,4.9) 115(15.42,4.5) 116(18.5,4.5) 117(15.42,4.1) 118(18.5,4.1) 119(15.42,3.7) 120(18.5,3.7) 121(15.42,3.3) 122(18.5,3.3) 123(15.42,2.9) 124(18.5,2.9) 125(15.42,2.5) 126(18.5,2.5) 127(15.42,2.1) 128(18.5,2.1) 129(15.42,1.7) 130(18.5,1.7) 131(15.42,1.3) 132(18.5,1.3) 133(15.42,0.9) 134(18.5,0.9) 135(15.42,0.5) 136(18.5,0.5) 137(15.42,0.1) 138(18.5,0.1) 139(15.42,-0.3) 140(18.5,-0.3) 141(15.42,-0.7) 142(18.5,-0.7) 143(15.42,-1.1) 144(18.5,-1.1) 145(15.42,-1.5) 146(18.5,-1.5) 147(15.42,-1.9) 148(18.5,-1.9) 149(15.42,-2.3) 150(18.5,-2.3) 151(15.42,-2.7) 152(18.5,-2.7) 153(15.42,-3.1) 154(18.5,-3.1) 155(15.42,-3.5) 156(18.5,-3.5) 157(15.42,-3.9) 158(18.5,-3.9) 159(15.42,-4.3) 160(18.5,-4.3) 161(15.42,-4.7) 162(18.5,-4.7) 163(15.42,-5.1) 164(18.5,-5.1) 165(15.42,-5.5) 166(18.5,-5.5) 167(15.42,-5.9) 168(18.5,-5.9) 169(15.42,-6.3) 170(18.5,-6.3) 171(15.42,-6.7) 172(18.5,-6.7) 173(15.42,-7.1) 174(18.5,-7.1) 175(15.42,-7.5) 176(18.5,-7.5) 177(15.42,-7.9) 178(18.5,-7.9) 179(15.42,-8.3) 180(18.5,-8.3) 181(15.42,-8.7) 182(18.5,-8.7) 183(15.42,-9.1) 184(18.5,-9.1) 185(15.42,-9.5) 186(18.5,-9.5) 187(15.42,-9.9) 188(18.5,-9.9) 189(15.42,-10.3) 190(18.5,-10.3) 191(15.42,-10.7) 192(18.5,-10.7) 193(15.42,-11.1) 194(18.5,-11.1) 195(15.42,-11.5) 196(18.5,-11.5) 197(15.42,-11.9) 198(18.5,-11.9) 199(15.42,-12.3) 200(18.5,-12.3)
  silkscreen extent -20,-27.5 20,27.5, body extent -20,-27.5 20,27.5, height 5.12
"SMD LED 0606 DUAL GREEN RED" [mm]
  rect 0.8x0.7 smd: 1(0.7,-0.5) 2(0.7,0.5) 3(-0.7,-0.5) 4(-0.7,0.5)
  silkscreen extent -1.75,-0.2 -1.55,0.2, body extent -0.8,-0.75 0.8,0.75, height 0.55
soic-8 [mm] "SOIC-8 Width 150mil"
  rect 0.61x1.6 smd: 1(-1.905,-2.7) 2(-0.635,-2.7) 3(0.635,-2.7) 4(1.905,-2.7) 5(1.905,2.7) 6(0.635,2.7) 7(-0.635,2.7) 8(-1.905,2.7)
  silkscreen extent -2.77,-2.62 2.5,2, body extent -2.5,-3.05 2.5,3.15, height 1.92
SOIC-8 [mm] "SOIC-8 Width 150mil"
  rect 0.61x1.6 smd: 1(-1.905,-2.7) 2(-0.635,-2.7) 3(0.635,-2.7) 4(1.905,-2.7) 5(1.905,2.7) 6(0.635,2.7) 7(-0.635,2.7) 8(-1.905,2.7)
  silkscreen extent -2.77,-2.62 2.5,2, body extent -2.5,-3.05 2.5,3.15, height 1.92
SOT-23-3 [mm]
  rect 0.9x0.8 smd: 1(-1.05,1.075) 2(-1.05,-1.025) 3(1.1,0.025)
  silkscreen extent -1.29,-1.5 1.22,2, body extent -1.26,-1.49 1.22,1.51, height 1.08
SOT-223-2 [mm]
  rect 2.5x1.5 smd: 1(0,0) 2(0,-2.3) 3(0,-4.6)
  rect 2x3.8 smd: EP(6.3,-2.3)
  silkscreen extent -0.4,-5.6 5.3,1.62, body extent -0.4,-5.56 6.3,0.94, height 1.8
TANTAL_7343 [mm]
  rect 2.77x2.55 smd: 1(-3.22,0) 2(3.22,0)
  silkscreen extent -3.65,-2.15 3.65,2.15, body extent -3.8,-2.3 3.8,2.3, height 3.1
TQFP-144_20x20_P0.5 [mm]
  oval 1.8x0.3 smd: 1(-10.55,8.75) 2(-10.55,8.25) 3(-10.55,7.75) 4(-10.55,7.25) 5(-10.55,6.75) 6(-10.55,6.25) 7(-10.55,5.75) 8(-10.55,5.25) 9(-10.55,4.75) 10(-10.55,4.25) 11(-10.55,3.75) 12(-10.55,3.25) 13(-10.55,2.75) 14(-10.55,2.25) 15(-10.55,1.75) 16(-10.55,1.25) 17(-10.55,0.75) 18(-10.55,0.25) 19(-10.55,-0.25) 20(-10.55,-0.75) 21(-10.55,-1.25) 22(-10.55,-1.75) 23(-10.55,-2.25) 24(-10.55,-2.75) 25(-10.55,-3.25) 26(-10.55,-3.75) 27(-10.55,-4.25) 28(-10.55,-4.75) 29(-10.55,-5.25) 30(-10.55,-5.75) 31(-10.55,-6.25) 32(-10.55,-6.75) 33(-10.55,-7.25) 34(-10.55,-7.75) 35(-10.55,-8.25) 36(-10.55,-8.75) 73(10.55,-8.75) 74(10.55,-8.25) 75(10.55,-7.75) 76(10.55,-7.25) 77(10.55,-6.75) 78(10.55,-6.25) 79(10.55,-5.75) 80(10.55,-5.25) 81(10.55,-4.75) 82(10.55,-4.25) 83(10.55,-3.75) 84(10.55,-3.25) 85(10.55,-2.75) 86(10.55,-2.25) 87(10.55,-1.75) 88(10.55,-1.25) 89(10.55,-0.75) 90(10.55,-0.25) 91(10.55,0.25) 92(10.55,0.75) 93(10.55,1.25) 94(10.55,1.75) 95(10.55,2.25) 96(10.55,2.75) 97(10.55,3.25) 98(10.55,3.75) 99(10.55,4.25) 100(10.55,4.75) 101(10.55,5.25) 102(10.55,5.75) 103(10.55,6.25) 104(10.55,6.75) 105(10.55,7.25) 106(10.55,7.75) 107(10.55,8.25) 108(10.55,8.75)
  oval 0.3x1.8 smd: 37(-8.75,-10.55) 38(-8.25,-10.55) 39(-7.75,-10.55) 40(-7.25,-10.55) 41(-6.75,-10.55) 42(-6.25,-10.55) 43(-5.75,-10.55) 44(-5.25,-10.55) 45(-4.75,-10.55) 46(-4.25,-10.55) 47(-3.75,-10.55) 48(-3.25,-10.55) 49(-2.75,-10.55) 50(-2.25,-10.55) 51(-1.75,-10.55) 52(-1.25,-10.55) 53(-0.75,-10.55) 54(-0.25,-10.55) 55(0.25,-10.55) 56(0.75,-10.55) 57(1.25,-10.55) 58(1.75,-10.55) 59(2.25,-10.55) 60(2.75,-10.55) 61(3.25,-10.55) 62(3.75,-10.55) 63(4.25,-10.55) 64(4.75,-10.55) 65(5.25,-10.55) 66(5.75,-10.55) 67(6.25,-10.55) 68(6.75,-10.55) 69(7.25,-10.55) 70(7.75,-10.55) 71(8.25,-10.55) 72(8.75,-10.55) 109(8.75,10.55) 110(8.25,10.55) 111(7.75,10.55) 112(7.25,10.55) 113(6.75,10.55) 114(6.25,10.55) 115(5.75,10.55) 116(5.25,10.55) 117(4.75,10.55) 118(4.25,10.55) 119(3.75,10.55) 120(3.25,10.55) 121(2.75,10.55) 122(2.25,10.55) 123(1.75,10.55) 124(1.25,10.55) 125(0.75,10.55) 126(0.25,10.55) 127(-0.25,10.55) 128(-0.75,10.55) 129(-1.25,10.55) 130(-1.75,10.55) 131(-2.25,10.55) 132(-2.75,10.55) 133(-3.25,10.55) 134(-3.75,10.55) 135(-4.25,10.55) 136(-4.75,10.55) 137(-5.25,10.55) 138(-5.75,10.55) 139(-6.25,10.55) 140(-6.75,10.55) 141(-7.25,10.55) 142(-7.75,10.55) 143(-8.25,10.55) 144(-8.75,10.55)
  silkscreen extent -10.67,-9.25 9.25,9.57, body extent -11,-11 11,11, height 1.6
"USB MiniUSB B Vertical THT" [mm] "5787834-2"
  oct 1x1 hole 0.6: 1(-1.6,-0.95)
  round 1 hole 0.6: 2(-0.8,0.95) 3(0,-0.95) 4(0.8,0.95) 5(1.6,-0.95)
  round 3 hole 2: S(-4.2,0) S(4.2,0)
  silkscreen extent -3.85,-2 3.85,2, body extent -5.1,-1.95 5.1,1.95, height 9.6

## Part data
BAT1: "CR2032 Battery", Type=Mechanical
C1 C2 C3 C4 C5 C6 C7 C9 C10 C11 C12 C14 C15 C16 C17 C19 C20 C21 C22 C24 C27 C28 C29 C30 C38 C39 C40 C41 C42 C43 C44 C45 C47 C49: "0402 100nF 25.0V", Package=0402, Supplier Part Number 1=80-C0402C104K3R, Supplier 1=Mouser, Type=SMD
C25 C26 C32: "1206 1nF 2.5kV", Package=1206, Supplier Part Number 1=603-CC1206KKX7RSBB10, Supplier 1=Mouser, Type=SMD
C31 C50: "Tantal 7.3x4.3 220uF 10V", Package=-, Supplier Part Number 1=80-T491D227K010, Supplier 1=Mouser, Type=SMD
C33 C34: "0402 22pF 16V", Package=0402, Supplier Part Number 1=80-C0402C220J4GAUTO, Supplier 1=Mouser, Type=SMD
C35 C36: "0603 10uF 6.3V", Package=0603, Supplier Part Number 1=963-JMK107BJ106MA-T, Supplier 1=Mouser, Type=SMD
C37 C46 C48: "0402 4.7uF 6.3V", Package=0402, Supplier Part Number 1=81-GRM153R60J475ME5D, Supplier 1=Mouser, Type=SMD
D1 D2 D4: "SMD LED 0606 Dual RED GREEN", Package=0603, Supplier Part Number 1=859-LTST-C195KGJRKT, Supplier 1=Mouser, Type=SMD
D3: "SMD LED 0603 RED", Package=0603, Supplier Part Number 1=604-APT1608EC, Supplier 1=Mouser, Type=SMD
J1: "PicoBlade 01x05 Male THT", Package=-, Supplier Part Number 1=538-53047-0510, Supplier 1=Mouser, Type=THT
J2: "PicoBlade 01x06 Male THT", Package=-, Supplier Part Number 1=538-53047-0610, Supplier 1=Mouser, Type=THT
J3: "RJ45 MagJack 1Gbit", Package=-, Supplier Part Number 1=538-93626-3006, Supplier 1=Mouser, Type=THT
J4 J12: "MiniUSB B Female Vertical THT", Supplier Part Number 1=710-651005136421, Supplier 1=Mouser, Type=THT
J5: "USB A Female Vertical THT", Package=-, Supplier Part Number 1=710-614004135023, Supplier 1=Mouser, Supplier 2=Digi-Key, Supplier Part Number 2=732-2732-ND, Type=THT
J6: "DIP switch SMD 2P", Supplier Part Number 1=710-416131160802, Supplier 1=Mouser, Type=SMD
J7: "WR-CRD Micro SD Card Connector", Supplier Part Number 1=710-693072010801, Supplier 1=Mouser, Type=SMD
J8: "Knopfzellen-Batteriehalter SMD", Package=-, Supplier Part Number 1=534-1060TR, Supplier 1=Mouser, Type=SMD
J9 J11: "Pinheader 02x36 Male THT", Package=-, Supplier Part Number 1=649-77313-424-72LF, Supplier 1=Mouser, Type=THT
J10: "Pinheader 02x13 Male THT", Package=-, Supplier Part Number 1=649-75844-127-26LF, Supplier 1=Mouser, Type=THT
L1 L2 L4 L5: "Ferritperle 1A", Package=0603, Supplier Part Number 1=710-742792651, Supplier 1=Mouser, Type=SMD
L3: "Ferritperle 3A", Package=1812, Supplier Part Number 1=710-742792514, Supplier 1=Mouser, Type=SMD
M1: "Compute Module 4 Socket", Package=-, Supplier Part Number 1=798-DF40C100DS0.4V51, Supplier 1=Mouser, Type=SMD
MH1 MH2 MH3 MH4: "WA-SMSE SMD Steel M2.5 Internal 2.9mm", Supplier Part Number 1=710-9774015151R, Supplier 1=Mouser, Type=THT
Q1: "Oscillator 48 Mhz 3.2 x 2.5", Package=3.2x2.5, Supplier Part Number 1=520-3225MV-480-CNT, Supplier 1=Mouser, Type=SMD
Q2: "Crystal 12 Mhz 3.2 x 2.5", Package=3.2x2.5, Supplier Part Number 1=815-8W12-7D1XT, Supplier 1=Mouser, Type=SMD
R1 R11 R12 R13 R14 R15 R16 R17 R22 R25 R26: "0402 10.0K", Package=0402, Supplier Part Number 1=603-RC0402FR-0710KL, Supplier 1=Mouser, Type=SMD
R2 R3 R4 R7 R8 R27 R28: "0402 220R", Package=0402, Supplier Part Number 1=603-RC0402FR-07220RL, Supplier 1=Mouser, Type=SMD
R5 R6: "0402 430R", Package=0402, Supplier Part Number 1=603-RC0402FR-07430RL, Supplier 1=Mouser, Type=SMD
R9 R10: "0402 22.0R", Package=0402, Supplier Part Number 1=603-RC0402FR-0722RL, Supplier 1=Mouser, Type=SMD
R18 R24: "0402 2.2K", Package=0402, Supplier Part Number 1=603-RC0402FR-072K2L, Supplier 1=Mouser, Type=SMD
R19: "0402 4.7K", Package=0402, Supplier Part Number 1=603-RC0402FR-074K7L, Supplier 1=Mouser, Type=SMD
R20: "0402 0R", Package=0402, Supplier Part Number 1=603-RC0402FR-070RL, Supplier 1=Mouser, Type=SMD
R21: "0402 1.0K", Package=0402, Supplier Part Number 1=603-RC0402FR-071KL, Supplier 1=Mouser, Type=SMD
R23: "0402 12.0K", Package=0402, Supplier Part Number 1=603-RC0402FR-0712KL, Supplier 1=Mouser, Type=SMD
U1: "32-Bit ATSam ARM 128KB Flash", Package=QFN32, Supplier Part Number 1=556-ATSAMC21E17A-MUT, Supplier 1=Mouser, Type=SMD
U2: "MachXO2 High Performance; 7000 LUTs; 3.3V", Package=TQFP-144, Supplier Part Number 1=842-27000HC4TG144C, Supplier 1=Mouser, Type=SMD
U3: "I2C EEPROM with 64kBit Memory", Package=SOIC-8, Supplier Part Number 1=579-24LC512-I/SN, Supplier 1=Mouser, Type=SMD
U4: "Extremely Accurate I2C-IntegratedRTC/TCXO/Crystal", Supplier Part Number 1=700-DS3231MZ+, Supplier 1=Mouser, Type=SMD
U5: "USB-IC-Schnittstelle USB to Serial UART QuadPort", Supplier Part Number 1=895-FT4232HQ, Supplier 1=Mouser, Type=SMD
U6: "1K Microwire Compatible Serial EEPROM", Supplier Part Number 1=579-93LC46BISN, Supplier 1=Mouser, Type=SMD
U7: "LDO Spannungs-Regulator 1.5A 3.3V", Package=SOT-223-2, Supplier Part Number 1=584-LT1963EST-3.3PBF, Supplier 1=Mouser, Type=SMD
U8: "+3V Voltage Monitoring, Low-Cost μP Supervisory Circuit", Supplier Part Number 1=700-MAX706TESAT, Supplier 1=Mouser, Type=SMD
U9 U10: "45 V, 100 mA NPN general-purpose transistor", Package=SOT23, Supplier Part Number 1=771-BC847C235, Supplier 1=Mouser, Type=SMD
S1 S2 S3 S4 SD1: Type=Mechanical

## Free pads (board coordinates)
  round 196.85 hole 98.43: ""(4055.12,4055.12) ""(4055.12,6574.8) ""(7755.91,4055.12) ""(7755.91,6574.8)

## Via types
v1: diameter 24.02, hole 11.81, Top Layer to Bottom Layer, tented both sides, 347 vias

## Nets (pads, with @x,y where several pads share a name; then routed paths per layer and width w, separated by ;. In a path a pad name is that pad's centre, name@x,y a point inside that pad or via, vN(x,y) a via of type N, cw(c..) or ccw(c..) an arc to the next point about the centre after c; other vN are vias at no path point)
+1.8V_FTDI: C37.2 C38.2 C39.2 C40.2 U5.12 U5.37 U5.49 U5.64 | length 1527.1
  Top Layer w11.81: C37.2@6771.65,5423.23 6797.88,5423.23 6809.78,5435.13 v1(6811.02,5435.13) ; v1@6814.33,5433.07 6824.17,5423.23 U5.49@6857.28,5423.23 ; C38.2@6820.87,5059.06 6822.83,5059.06 v1(6851.38,5087.6) 6857.28,5093.5 U5.64@6857.28,5127.95 ; v1(7106.3,5145.67) U5.12@7106.3,5095.47 7106.3,5067.97 7118.5,5055.76 7140.54,5055.76 7153.09,5043.21 7218.6,5043.21 7242.13,5019.69 C39.2@7244.09,5019.69 ; U5.37@7106.3,5455.71 7106.3,5487.49 ; C40.2@7106.3,5541.34 7106.3,5487.49 ; v1(7137.8,5496.06) 7134.49,5496.06 7125.92,5487.49 7106.3,5487.49
  Signal Layer 1 w15.75: v1(6811.02,5435.13) 7076.87,5435.13 v1(7137.8,5496.06)
  Signal Layer 2 w15.75: v1(6851.38,5087.6) 6909.45,5145.67 v1(7106.3,5145.67) 7137.8,5177.17 v1(7137.8,5496.06)